# Altium PCB NB2DSK01.PcbDoc (part 17 of 17)
Units mil, origin at the board's own origin, x right, y up, seen from the top; angles counter-clockwise.
Board outline 11815 x 6500.03 mil, 8 copper layers (Top Layer, MidLayer1, MidLayer2, GND, PWR, MidLayer3, MidLayer4, Bottom Layer), stack 74.62 mil thick; 798 components, 1002 nets, 3927 pads, 3182 vias.
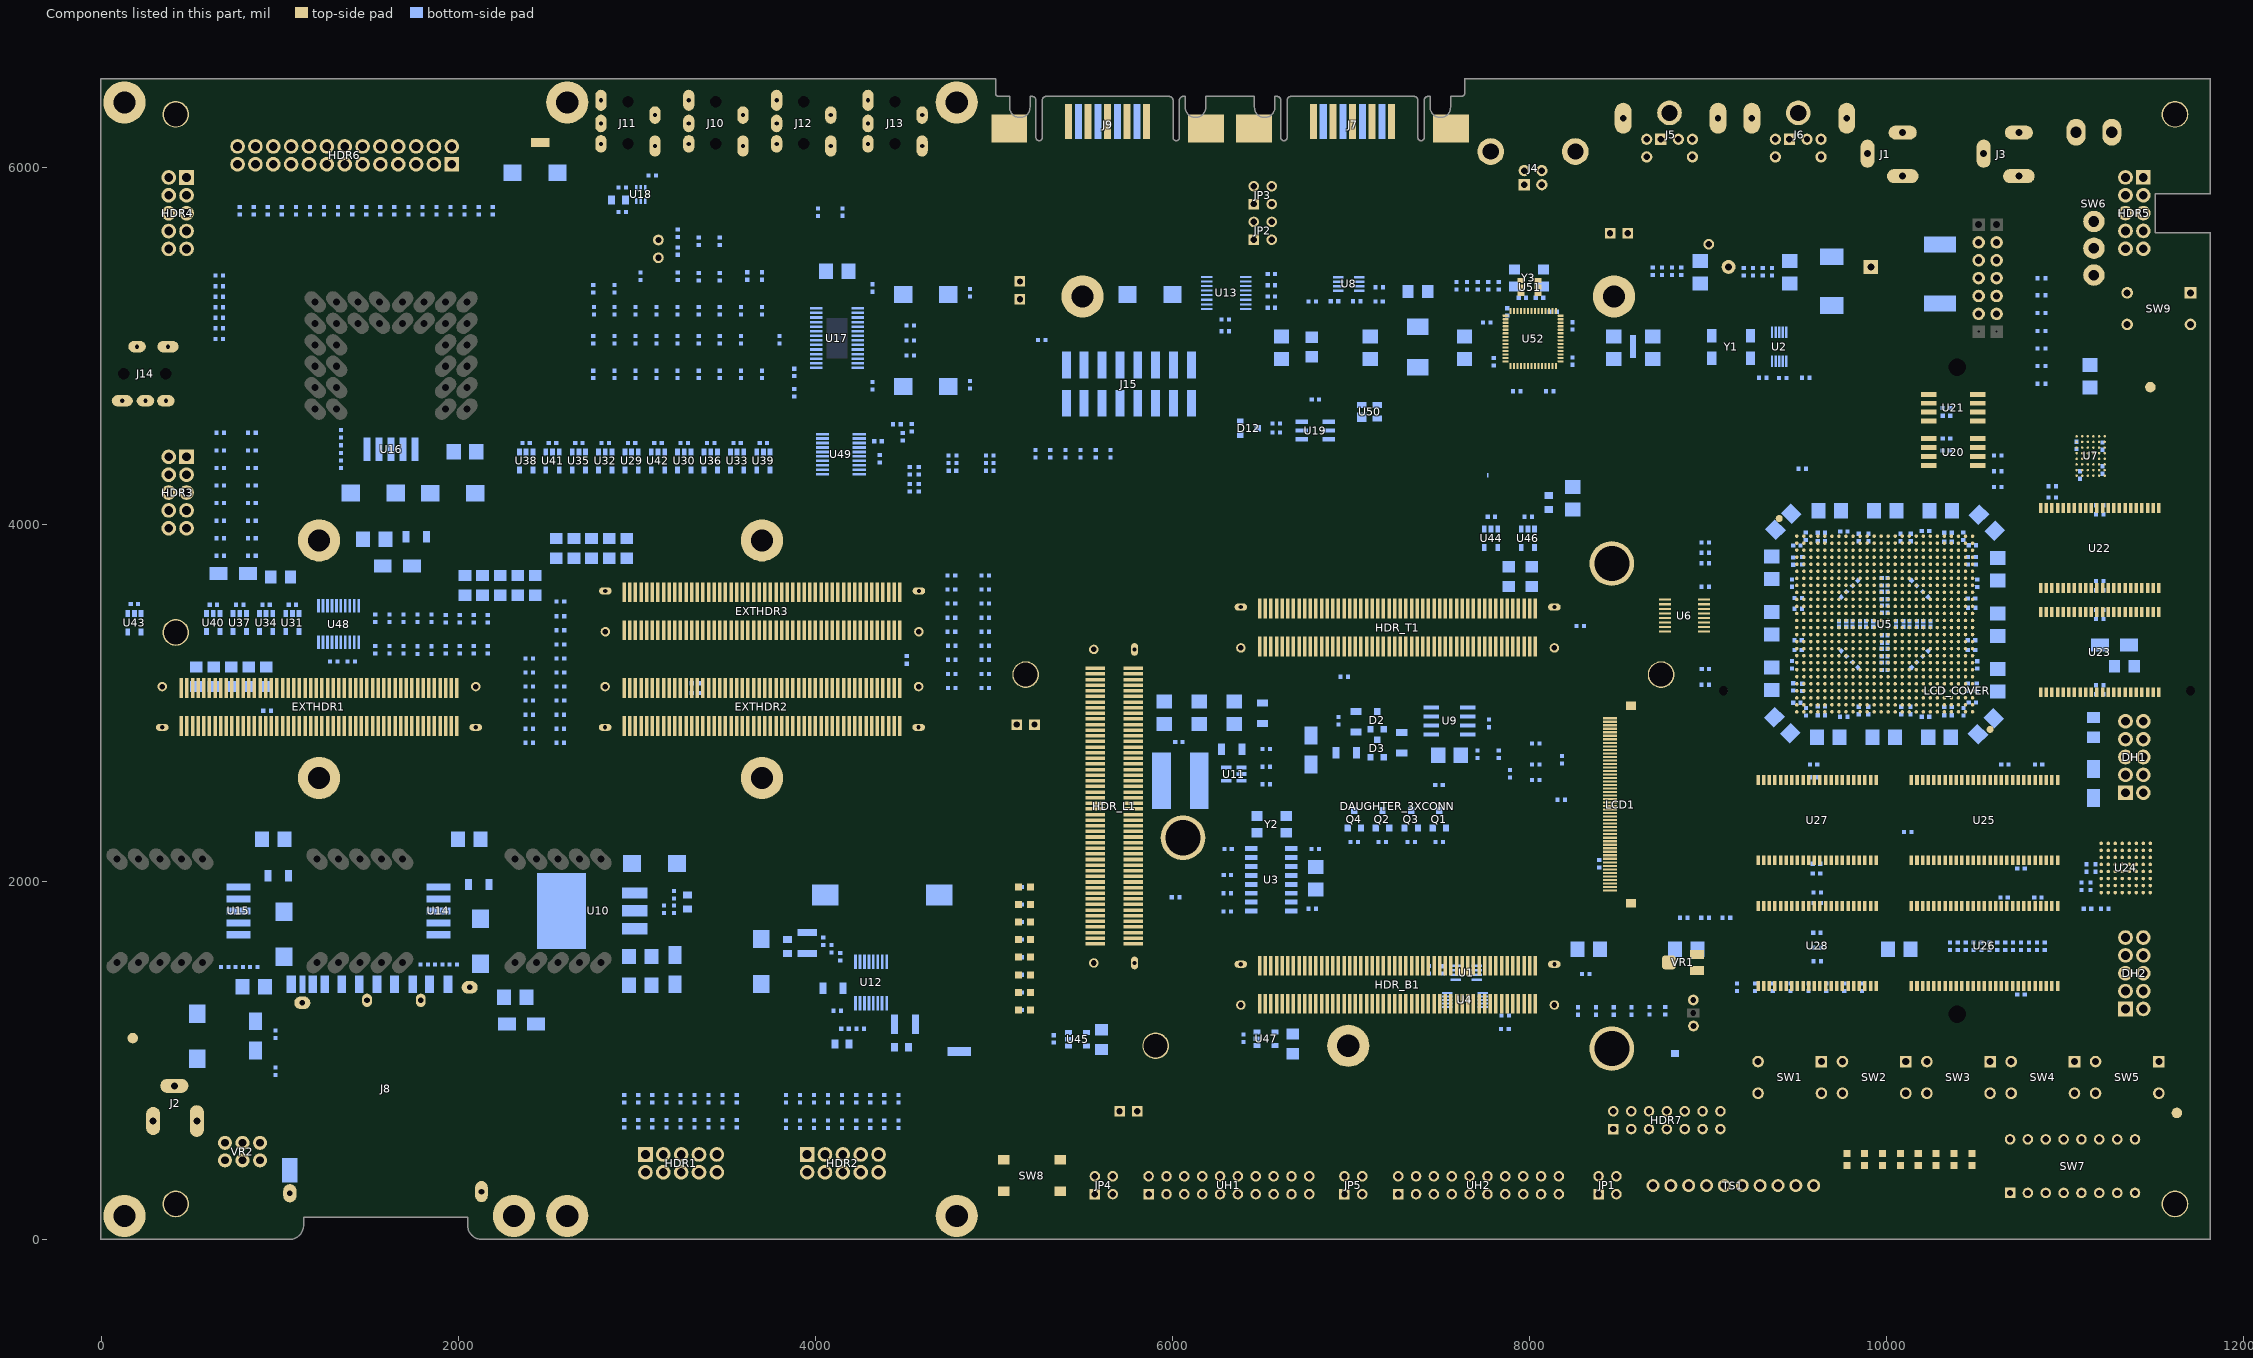
[diagram p23: the components of this part, seen from the top]

## Silkscreen, mask and mechanical layers (free items; w line width, h text height) (continued)
6. Fabrication Notes:
  drawing of 1666 lines, arcs and shapes, not listed
  text "1" at -314.94,10439.41 h118
  text "2" at 2519.06,10439.41 h118
  text "3" at 5354.06,10439.41 h118
  text "4" at 8070.06,10439.41 h118
  text "5" at 10905.06,10439.41 h118
  text "6" at 13661.06,10439.41 h118
  text "7" at 16496.06,10439.41 h118
  text "8" at 19409.06,10439.41 h118
  text "DESIGN INFORMATION" at 15492.06,10277.77 h79
  text "PRODUCT FAMILY" at -1394.28,10247.94 h118.11
  text "DRAWING ID/MODEL." at 1499.42,10247.94 h118.11
  text "(REFER ALSO PROFILING INFORMATION)" at 18009.06,10128.77 h69
  text "BOARD TECHNOLOGY" at 15492.06,10119.77 h75
  text "BOARD SIZE" at 17323.06,10119.77 h75
  text "4 TRACK" at 15486.86,9999.98 h69
  text "24 VIA" at 16051.86,9999.98 h69
  text "4 SPACE" at 16551.86,9999.98 h69
  text "300mm" at 17322.61,9991.95 h69
  text "165mm" at 18066.7,9991.95 h69
  text "X" at 17942.03,9984.27 h69
  text "NANOBOARD" at -780.94,9941.41 h120
  text "NB2DSK01.08" at 2377.81,9937.89 h140
  text "(MIN. TRACK / PADS / CLEARANCE" at 15494.06,9813.77 h69
  text "IN 0.001\" )" at 17265.06,9813.77 h69
  text "EXTERNAL" at 17546.06,9693.77 h69
  text "PER IPC-D-275 CLASS 2" at 18098.06,9693.77 h69
  text "LEVEL C AND IS THE" at 19426.06,9693.77 h69
  text "MINIMUM ANNULAR RING 0.05MM" at 15494.06,9692.77 h69
  text "(0.002\")" at 17088.06,9692.77 h69
  text "LAYER STACK CONFIGURATION" at 6836.2,9682.9 h49.21
  text "MANUFACTURING REGISTRATION" at 15499.06,9575.77 h69
  text "ALLOWANCE" at 17054.06,9575.77 h69
  text "BUILD CONFIGURATION AND SPECIFICATIONS SUMMARY" at 11029.67,9573.32 h80
  text "8 LAYER BUILD" at 7051.1,9411.9 h49.21
  text "8 Layer Build" at 11108.57,9403.82 h60
  text "Silk-Screened White Legend" at 12874.57,9403.82 h60
  text "5 Thou Tracks / 5 Thou Spacing" at 11108.57,9293.82 h60
  text "DO NOT TRIM Legend (Silkscreen)" at 12874.57,9293.82 h60
  text "BUILD STATISTICS" at 128.84,9268.04 h60
  text "BUILD STATISTICS" at 128.84,9268.04 h60
  text "8" at 20232.28,9196.85 h69
  text "CIRCUIT TYPE:" at 15492.06,9195.77 h75
  text "SS" at 16492.18,9195.77 h69
  text "DS" at 17243.06,9195.77 h69
  text "PTH MULTILAYER" at 18050.06,9195.77 h69
  text "Number of Layers :" at 19114.06,9195.77 h69
  text "X" at 17897.64,9192.91 h69
  text "24 Thou Via / 0.30mm Hole" at 11108.57,9183.82 h60
  text "Board Thickness Approx 1.7mm" at 12874.57,9183.83 h60
  text "A" at -1614.94,9179.41 h118
  text "A" at 20590.06,9179.41 h118
  text "GENERAL" at 120.84,9122.04 h40
  text "GENERAL" at 120.84,9122.04 h40
  text "-  COPPER CLAD" at 7793.54,9079.75 h29.53
  text "-  35 Micron H.T.E" at 8221.54,9079.75 h29.53
  text "TL" at 6748.01,9074.75 h49.21
  text "1 Oz Copper Clad" at 11108.57,9073.82 h60
  text "BOARD OUTLINE Layer Denotes Board Cutout" at 12874.57,9073.82 h60
  text "TOP LAYER" at 6246.77,9051.75 h49.21
  text ".Net_Count" at 501.84,9039.04 h40
  text ".Net_Count" at 501.84,9039.04 h40
  text "NETS" at 123.84,9037.04 h35
  text "NETS" at 123.84,9037.04 h35
  text "-  PRE-PREG" at 7818.54,9024.75 h29.53
  text "-  1080" at 8221.54,9023.75 h29.53
  text "FINGER CONNECTOR DIM PER:" at 15492.06,9018.77 h75
  text "AS SHOWN" at 19114.06,9018.77 h69
  text "-  PRE-PREG" at 7818.54,8979.82 h29.53
  text "-  1080" at 8221.54,8978.75 h29.53
  text "3um Immersion Gold" at 11108.57,8963.82 h60
  text "Must be BBT (Bare Board Tested)" at 12874.57,8963.82 h60
  text ".Component_Count" at 501.84,8957.04 h40
  text ".Component_Count" at 501.84,8957.04 h40
  text "COMPONENTS" at 124.84,8956.04 h35
  text "COMPONENTS" at 124.84,8956.04 h35
  text "MID LAYER 1" at 6246.78,8933.31 h49.21
  text "L1" at 6748,8929.81 h49.21
  text "-  35 Micron H.T.E" at 8221.54,8927.75 h29.53
  text "-  COPPER CLAD" at 7792.77,8927.65 h29.53
  text "-  CORE" at 7818.54,8874.82 h29.53
  text "-  0.25mm 35/35" at 8221.54,8874.75 h29.53
  text "No. OFF TOTAL" at 16516.06,8860.77 h69
  text "Gloss Black Solder Mask" at 11108.57,8853.82 h60
  text "Include BBT Certificate with Order" at 12874.57,8853.82 h60
  text "BOTH SIDES" at 19114.06,8842.27 h69
  text "ONE SIDE" at 18051.06,8840.77 h69
  text "-  35 Micron H.T.E" at 8221.54,8820.75 h29.53
  text "-  COPPER CLAD" at 7792.77,8820.15 h29.53
  text "PRIMITIVES" at 121.84,8819.04 h40
  text "PRIMITIVES" at 121.84,8819.04 h40
  text "MID LAYER 2" at 6247.69,8812.84 h49.21
  text "L2" at 6747.69,8812.84 h49.21
  text "-  1080" at 8221.54,8770.75 h29.53
  text "-  PRE-PREG" at 7817.77,8769.2 h29.53
  text ".Fill_Count" at 501.84,8735.04 h40
  text ".Fill_Count" at 501.84,8735.04 h40
  text "FILLS" at 124.84,8734.04 h35
  text "FILLS" at 124.84,8734.04 h35
  text "Include All BBT Failed Boards With Order" at 11109.57,8731.82 h60
  text "-  PRE-PREG" at 7817.77,8724.27 h29.53
  text "-  1080" at 8221.54,8723.75 h29.53
  text "P1" at 6747.69,8672.84 h49.21
  text "-  COPPER CLAD" at 7792.01,8672.1 h29.53
  text "-  35 Micron H.T.E" at 8221.54,8670.75 h29.53
  text "INTERNAL PLANE 1" at 6062.99,8669.29 h49.21
  text ".Track_Count" at 501.84,8654.04 h40
  text ".Track_Count" at 501.84,8654.04 h40
  text "TRACKS" at 124.84,8652.04 h35
  text "TRACKS" at 124.84,8652.04 h35
  text "FEED THRU'" at 16527.24,8645.27 h69
  text "TENTED" at 17480.06,8645.27 h69
  text "VIAS:" at 15492.06,8643.77 h75
  text "BURIED LAYER SEQUENCE" at 18425.06,8643.77 h69
  text "NONE" at 15987.41,8642.75 h69
  text "X" at 17303.06,8643.27 h69
  text "X" at 16337.21,8641.77 h69
  text "-  CORE" at 7817.77,8619.27 h29.53
  text "-  0.25mm 35/35" at 8221.54,8618.75 h29.53
  text ".String_Count" at 501.84,8572.04 h40
  text ".String_Count" at 501.84,8572.04 h40
  text "STRINGS" at 124.84,8570.04 h35
  text "STRINGS" at 124.84,8570.04 h35
  text "-  COPPER CLAD" at 7792.01,8564.6 h29.53
  text "-  35 Micron H.T.E" at 8221.54,8563.75 h29.53
  text "P2" at 6746.94,8557.29 h49.21
  text "INTERNAL PLANE 2" at 6062.99,8555.12 h49.21
  text "-  1080" at 8221.54,8513.75 h29.53
  text "-  PRE-PREG" at 7817.01,8513.65 h29.53
  text ".Arc_Count" at 501.84,8489.04 h40
  text ".Arc_Count" at 501.84,8489.04 h40
  text "ARC'S" at 124.84,8487.04 h35
  text "ARC'S" at 124.84,8487.04 h35
  text "-  PRE-PREG" at 7817.01,8468.73 h29.53
  text "-  1080" at 8221.54,8468.75 h29.53
  text "UNIQUE DRILL" at 16527.24,8448.27 h69
  text "2 SIZES" at 17480.06,8446.77 h69
  text "BLIND LAYER SEQUENCE" at 18425.06,8446.77 h69
  text "X" at 16337.06,8444.27 h69
  text "MID LAYER 3" at 6246.94,8417.27 h49.21
  text "L3" at 6746.94,8417.27 h49.21
  text "-  35 Micron H.T.E" at 8221.54,8416.75 h29.53
  text "-  COPPER CLAD" at 7791.25,8416.55 h29.53
  text "LANDS" at 120.84,8368.04 h40
  text "LANDS" at 120.84,8368.04 h40
  text "-  CORE" at 7817.01,8363.73 h29.53
  text "-  0.25mm 35/35" at 8221.54,8363.75 h29.53
  text "-  COPPER CLAD" at 7791.25,8309.05 h29.53
  text "-  35 Micron H.T.E" at 8221.54,8308.75 h29.53
  text "MID LAYER 4" at 6246.19,8301.74 h49.21
  text "L4" at 6746.19,8301.74 h49.21
  text ".Pad_Count" at 501.84,8284.04 h40
  text ".Pad_Count" at 501.84,8284.04 h40
  text "PADS" at 124.84,8282.04 h35
  text "PADS" at 124.84,8282.04 h35
  text "X" at 18964.06,8271.27 h69
  text "AS SHOWN" at 19114.06,8271.27 h69
  text "LAYER CONSTRUCTION PER:" at 15492.06,8269.77 h75
  text "LAMINATION SEQUENCE" at 17303.06,8269.77 h69
  text "-  PRE-PREG" at 7816.25,8258.11 h29.53
  text "-  1080" at 8221.54,8257.75 h29.53
  text "-  PRE-PREG" at 7816.25,8213.18 h29.53
  text "-  1080" at 8221.54,8210.75 h29.53
  text ".Via_Count" at 501.84,8202.04 h40
  text ".Via_Count" at 501.84,8202.04 h40
  text "VIA'S" at 125.84,8201.04 h35
  text "VIA'S" at 125.84,8201.04 h35
  text "BL" at 6746.18,8161.73 h49.21
  text "-  35 Micron H.T.E" at 8221.54,8161.75 h29.53
  text "BOTTOM LAYER" at 6169.29,8161.42 h49.21
  text "-  COPPER CLAD" at 7790.49,8161 h29.53
  text "NB2DSK01" at 18987.53,8102.19 h70
  text "FILE NAME:" at 18440.4,8090.49 h69
  text "X" at 17894.06,8076.27 h69
  text "CAD" at 18051.06,8075.27 h69
  text "ARTWORK:" at 15492.06,8073.77 h75
  text "MANUAL" at 16491.87,8073.77 h69
  text "DIGITISED" at 17244.06,8073.77 h69
  text "PRINT SCALE" at 117.84,8051.04 h40
  text "PRINT SCALE" at 117.84,8051.04 h40
  text "GERBER SET" at 18987.53,7988.01 h69
  text "FILE TYPE:" at 18440.4,7985.49 h69
  text ".Print_Scale" at 499.84,7966.04 h40
  text ".Print_Scale" at 499.84,7966.04 h40
  text "SCALE" at 122.84,7965.04 h35
  text "SCALE" at 122.84,7965.04 h35
  text "SUPPLIED ARTWORK/PATTERN MASTER LIST" at 15492.06,7825.77 h79
  text "TOTAL BOARD THICKNESS: APPROX" at 6151.61,7823.95 h49.21
  text "1.7mm +/- 0.1mm" at 7464,7797 h160
  text "DRAWING No./CAD FILE REF." at 17345.06,7675.77 h69
  text "REVISION" at 19951.25,7670.27 h69
  text "DESCRIPTION" at 15709.06,7668.77 h69
  text "8" at 20122.44,7490.47 h69.02
  text "NB2DSK01" at 15574.02,7472.28 h69.02
  text "ALTIUM NANOBOARD DESKTOP VERSION 8" at 17194.02,7472.28 h69.02
  text "B" at -1594.94,6424.41 h118
  text "B" at 20610.06,6424.41 h118
  text "DRILL DRAWING" at 15726.49,4082.96 h69
  text "APERTURE TABLES\FILES ARE EMBEDDED" at 17335.49,4082.96 h69
  text "1" at 20121.36,4080.74 h69
  text "C" at -1594.94,3864.41 h118
  text "C" at 20610.06,3864.41 h118
  text "POLYIMIDE" at 18482.32,3801.3 h69
  text "FR4-01" at 16428.87,3798.41 h69
  text "FR4-04" at 17137.87,3798.41 h69
  text "FR4-08" at 17826.87,3798.41 h69
  text "ARLON" at 19223.87,3798.41 h69
  text "TUC-722" at 19931.87,3798.41 h69
  text "X" at 19739.86,3792.34 h69
  text "MATERIAL:" at 15493.45,3791.31 h75
  text "THICKNESS:" at 15984.06,3611.41 h69
  text "~0.8mm" at 16850.06,3611.41 h69
  text "1.2mm" at 17559.06,3611.41 h69
  text "2mm" at 18937.06,3611.41 h69
  text "3.2mm" at 19645.06,3611.41 h69
  text "1.7mm" at 18240.17,3607.47 h69
  text "X" at 18058,3606 h69
  text "X" at 16660.64,3436.25 h68.9
  text "IN A/W ANSI IPC-6012 TYPE 3 CLASS 2" at 16850.08,3434.92 h69.02
  text "TOLERANCE:" at 15945.06,3433.41 h69
  text "OTHER +/-" at 19173.06,3433.41 h69
  text "X" at 16659.06,3258.91 h69
  text "IN A/W ANSI IPC-6012 TYPE 3 CLASS 2" at 16850.08,3257.91 h69.02
  text "BOW & TWIST:" at 15827.06,3256.41 h69
  text "AS SHOWN" at 19173.06,3256.41 h69
  text "COPPER THICKNESS (FINISHED)" at 15669.06,3078.41 h69
  text "18um (1/2oz)" at 16850.06,2902.91 h69
  text "OUTER:" at 16181.06,2901.41 h69
  text "35um (1oz)" at 18051.06,2901.41 h69
  text "70um (2oz)" at 19173.06,2901.41 h69
  text "X" at 17861.03,2898.41 h69
  text "18um (1/2oz)" at 16850.06,2725.91 h69
  text "INNER SIGNAL:" at 15846.06,2724.41 h69
  text "35um (1oz)" at 18051.06,2724.41 h69
  text "70um (2oz)" at 19173.06,2724.41 h69
  text "X" at 17861.03,2721.41 h69
  text "18um (1/2oz)" at 16850.06,2549.91 h69
  text "INNER PWR:" at 15964.06,2548.41 h69
  text "35um (1oz)" at 18051.06,2548.41 h69
  text "70um (2oz)" at 19173.06,2548.41 h69
  text "X" at 17861.03,2545.41 h69
  text "STRUCTURE:" at 15512.06,2351.41 h75
  text "REFER" at 16850.23,2351.41 h69
  text "AS SHOWN" at 19173.06,2175.91 h69
  text "X" at 18979.06,2174.91 h69
  text "AS PER DRAWING No." at 16850.06,2174.41 h69
  text "DRILLING:" at 15512.06,2016.41 h75
  text "X" at 16664.06,1880.91 h69
  text "COMPONENT SIDE" at 16850.06,1880.91 h69
  text "VIEWED FROM:" at 15846.06,1879.41 h69
  text "SOLDER SIDE" at 18051.06,1879.41 h69
  text "X" at 16664.06,1704.91 h69
  text "X" at 19489.06,1704.91 h69
  text "AS SHOWN" at 16850.06,1702.91 h69
  text "NC_ DRILL FILES" at 19685.06,1702.91 h69
  text "REFERENCE:" at 15945.06,1701.41 h69
  text "PATTERN MASTER LIST" at 18051.06,1701.41 h69
  text "20um" at 18051.06,1524.91 h69
  text "X" at 17859.06,1523.91 h69
  text "PTH MINIMUM COPPER THICKNESS:" at 16082.06,1523.41 h69
  text "OTHER" at 19173.06,1523.41 h69
  text "NPTH:" at 16220.06,1345.41 h69
  text "TENTED" at 16850.06,1345.41 h69
  text "PADS REMOVED" at 18051.06,1345.41 h69
  text "REMOVE PADS" at 19173.06,1345.41 h69
  text "NONE" at 19680.94,1168.91 h69
  text "2nd DRILL" at 16850.06,1167.41 h69
  text "BOTH" at 18051.06,1167.41 h69
  text "X" at 18451.53,1166.77 h69
  text "AS SHOWN" at 18641.57,1167.41 h69
  text "D" at -1594.94,1148.41 h118
  text "D" at 20610.06,1148.41 h118
  text "ETCHING" at 16850.06,951.91 h69
  text "BOARD FINISH:" at 15512.06,950.41 h75
  text "REFER PATTERN MASTER LIST" at 18051.06,950.41 h69
  text "X" at 18455.06,775.91 h69
  text "X" at 19499.06,775.91 h69
  text "COMPONENT" at 18641.06,773.91 h69
  text "SOLDER" at 19685.06,773.91 h69
  text "LEGEND / SCREEN PRINT:" at 16082.06,772.41 h69
  text "NONE" at 17756.06,772.41 h69
  text "mm" at -1849.94,754.41 h79 r90
  text "WHITE" at 16850.06,596.91 h69
  text "COLOUR:" at 16082.06,595.41 h69
  text "YELLOW" at 18051.06,595.41 h69
  text "OTHER" at 19173.06,595.41 h69
  text "X" at 16656.82,594.07 h69
  text "SCREEN PRINT" at 18641.06,400.91 h69
  text "SOLDER RESIST:" at 15768.06,399.41 h69
  text "LIQUID PHOTOIMAGEABLE" at 16850.06,399.41 h69
  text "X" at 18451.03,396.41 h69
  text "MATTE" at 17439.03,222.77 h69
  text "BLACK" at 19659.03,222.77 h69
  text "COLOUR:" at 16082.06,221.41 h69
  text "GLOSS" at 16850.06,221.41 h69
  text "BLUE" at 18641.06,221.41 h69
  text "G/Y" at 19173.06,221.41 h69
  text "X" at 16660.03,218.41 h69
  text "GREEN" at 18046.32,218.21 h69
  text "X" at 19495.03,218.41 h69
  text "TRACK FINISH:" at 15512.06,25.41 h75
  text "SELECTIVE SOLDER" at 16850.06,25.41 h69
  text "REFLOW SOLDER" at 18405.06,25.41 h69
  text "Radius 2.0mm" at 1392,-87 h39.37
  text "HASL (HOT AIR SOLDER LEVEL)" at 16850.36,-161.33 h69
  text "REFER PATTERN MASTER LIST" at 16850.06,-327.59 h69
  text "OTHER" at 18633.82,-327.59 h69
  text "3um IMMERSION GOLD SMOBC (SOLDER MASK OVER BARE COPPER)" at 16850.06,-524.09 h69
  text "X" at 16661.12,-529.41 h69
  text "HARD GOLD PLATE FINISH" at 16850.06,-702.59 h69
  text "OTHER" at 18405.06,-702.59 h69
  text "AS SHOWN" at 16850.06,-879.59 h69
  text "REFER" at 18405.06,-879.59 h69
  text "X" at 16659.06,-1074.09 h69
  text "CUT AND TRIM ACCORDING TO LAYER MECHANICAL 1 (BOARD OUTLINE)" at 16850.06,-1076.09 h69
  text "PROFILING:" at 15512.06,-1077.59 h75
  text "REFER PCB BLANK DWG No." at 16850.06,-1253.59 h69
  text "USE PROFILE/ ROUTE TAPE SUPPLIED" at 16850.06,-1430.59 h69
  text "(REFER PATTERN MASTER LIST)" at 18680.32,-1431.39 h69
  text "E" at -1594.94,-1509.59 h118
  text "E" at 20610.06,-1509.59 h118
  text "SQUARE CUT" at 16850.06,-1607.09 h69
  text "X" at 17625.03,-1609.23 h69
  text "N.C. ROUTE" at 17815.06,-1608.59 h69
  text "V. SCORE" at 18681.06,-1608.59 h69
  text "BLANK" at 19488.06,-1608.59 h69
  text "ACCEPTABILITY:" at 15492.06,-1805.59 h75
  text "MATERIALS AND WORKMANSHIP FOR" at 16653.06,-1805.59 h69
  text "ALL PRINTED WIRING BOARDS TO MEE" at 18425.06,-1805.59 h69
  text "T" at 20216.06,-1806.59 h69
  text "OR EXCEED THE REQUIREMENTS OF:" at 16634.06,-1923.59 h69
  text "X" at 16660.57,-2074.09 h69
  text "IN A/W ANSI IPC-A-600F" at 16849.57,-2080.09 h69
  text "2" at 18937.57,-2080.09 h69
  text "1" at 18622.57,-2081.59 h69
  text "3" at 19291.57,-2081.59 h69
  text "X" at 18786.62,-2085.41 h69
  text "UL CERTIFICATION" at 16849.57,-2259.59 h69
  text "AUSTEL" at 18661.57,-2259.59 h69
  text "A" at 17992.64,-2435.92 h69
  text "B" at 18307.64,-2435.92 h69
  text "MIL-P-55110E GRP" at 16849.57,-2436.59 h69
  text "AS2546" at 18655.97,-2436.59 h69
  text "OTHER" at 19448.97,-2436.59 h69
  text "ADDITIONAL REQUIREMENTS:" at 15489.06,-2596.59 h75
  text "NONE" at 16849.57,-2730.09 h69
  text "MICROSECTION:" at 15748.06,-2731.59 h69
  text "SAMPLE PLAN" at 17381.83,-2731.59 h69
  text "MIL-P-55110E SERIAL Nos. PER ORDER" at 18405.51,-2731.59 h69
  text "X" at 16658.35,-2736.04 h69
  text "2" at 20117.06,-2908.09 h69
  text "MIL-P-55110E GRP" at 17381.06,-2909.03 h69
  text "A" at 18524.14,-2908.36 h69
  text "B" at 18839.14,-2908.36 h69
  text "CERTIFICATION:" at 15748.06,-2909.59 h69
  text "NONE" at 16849.57,-2909.59 h69
  text "IPC CLASS:" at 18995.06,-2909.59 h69
  text "1" at 19764.06,-2909.59 h69
  text "3" at 20433.06,-2909.59 h69
  text "X" at 19927.03,-2912.59 h69
  text "PER ORDER" at 19645.03,-3079.73 h69
  text "QUALITY RELEASE REPORT" at 17381.06,-3087.59 h69
  text "OTHER" at 19192.06,-3087.59 h69
  text "X" at 19004.81,-3095.8 h69
  text "X" at 18200.06,-3260.09 h69
  text "REQUIRED" at 18400.06,-3263.09 h69
  text "ELECTRICAL TEST: Bare Board" at 15748.06,-3264.59 h66.93
  text "NONE" at 17381.06,-3264.59 h69
  text "PER ORDER" at 19192.06,-3264.59 h69
  text "0" at -1849.94,-3300.59 h79 r90
  text "2 SIDES" at 18522.77,-3441.09 h69
  text "MIN. PITCH" at 19193.06,-3441.42 h69
  text "SURFACE MOUNT:" at 15748.06,-3442.59 h69
  text "NONE" at 17381.06,-3442.59 h69
  text "0.65MM" at 19888.73,-3443.52 h69
  text "1 SIDE" at 17945.03,-3444.73 h69
  text "X" at 18329.03,-3450.23 h69
  text "LEGEND" at 18523.06,-3617.09 h69
  text "MANUFACTURER'S ID/LOGO:" at 15748.06,-3618.59 h69
  text "NONE" at 17381.06,-3618.59 h69
  text "FOIL" at 17971.38,-3618.59 h69
  text "REFER" at 19193.06,-3618.59 h69
  text "X" at 18333.03,-3621.59 h69
  text "X" at 17489.06,-3795.09 h69
  text "IS09001/AS3901" at 17676.06,-3795.09 h69
  text "NONE" at 18997.06,-3796.59 h69
  text "MANUFACTURER'S ACCREDITATION:" at 15748.06,-3816.59 h69
  text "DO NOT" at -2223.94,-3851.59 h79
  text "SCALE" at -2204.94,-3989.59 h79
  text "X" at 17187.68,-3990.09 h69
  text "PER ORDER" at 17384.68,-3991.09 h69
  text "PACKAGING AND HANDLING:" at 15748.06,-3992.59 h69
  text "REFER" at 18400.06,-3992.59 h69
  text "DIMENSIONS" at -2342.94,-4186.59 h79
  text "F" at -1594.94,-4225.59 h118
  text "F" at 20610.06,-4225.59 h118
  text "SCALE:" at 18935.76,-4284.52 h70
  text "NANOBOARD - NB2DSK" at 12679.31,-4287.87 h60
  text "PRODUCT" at 11970.02,-4302.88 h70
  text "ALTIUM LIMITED." at 16104.2,-4305.4 h80
  text "DATE" at 14446.92,-4307.51 h70
  text "IN" at -2086.94,-4324.59 h79
  text "LEVEL 3 / 12A RODBOROUGH ROAD" at 16102.2,-4428.8 h70
  text ".Print_Scale" at 19332.03,-4458.73 h100
  text "MILLIMETRES" at -2361.94,-4481.59 h79
  text "HARDWARE DEVELOPMENT GROUP" at 12679.32,-4486.9 h60
  text "DRAWN" at 11970.02,-4500.51 h70
  text "11.NOV.07" at 14345.02,-4504.72 h70
  text "FRENCHS FOREST - SYDNEY 2086" at 16102.2,-4570.2 h70
  text "DATE:" at 18932.76,-4678.22 h70
  text "APPROVED" at 11970.02,-4694.51 h70
  text "S.HOWELL" at 12679.32,-4698.72 h60
  text "NSW AUSTRALIA" at 16102.2,-4701.6 h70
  text "11.NOV.07" at 14345.02,-4704.72 h70
  text ".Print_Date" at 19302.03,-4833.73 h100
  text "RELEASE VERSION" at 5536.93,-4888.74 h70
  text "8" at 5045.93,-4892.76 h70
  text "PRODUCTION AND LOGISTICS" at 12679.31,-4892.6 h60
  text "CUSTOMER" at 11970.02,-4901.73 h70
  text "Title:" at 15117.92,-4905.81 h80
  text "SHEET" at 18936.23,-5071.92 h70
  text "NB2DSK01.08 DESKTOP NANOBOARD" at 15132.03,-5078.74 h90
  text "REVISION" at 4896.91,-5089.75 h70
  text "DESCRIPTION OF TASK OR MODIFICATION" at 7718.91,-5089.75 h70
  text "DATE" at 11455.8,-5108.92 h70
  text "APPD" at 10865.25,-5111.17 h70
  text "A2" at 20287.92,-5197.51 h78.74
  text ".Pcb_File_Name" at 7189.02,-5277.69 h70
  text ".Printout_Name" at 5584.02,-5292.73 h70
  text "TEMPLATE: -" at 4896.91,-5294.75 h70
  text "1" at -314.94,-5505.59 h118
  text "2" at 2519.06,-5505.59 h118
  text "3" at 5354.06,-5505.59 h118
  text "4" at 8070.06,-5505.59 h118
  text "5" at 10905.06,-5505.59 h118
  text "6" at 13661.06,-5505.59 h118
  text "7" at 16496.06,-5505.59 h118
  text "8" at 19409.06,-5505.59 h118
7. Assembly - Top:
  circle w5: c11614.18,6299.3 r110.24
  lines w5: 0,3228.35 0,3267.72 0,6496.07
8. Assembly - Bottom:
  circle w7.87: c4385.83,1901.58 r216.54
  circle w7.87: c4385.83,1901.58 r285.43
  lines w1.97: 8354.33,4346.46 9512.87,4346.46 9535.43,4311.02 ; 9415.02,4235.46 cw(c9988.19,3444.88) 9665.07,4366.37 ; 9527.56,4318.9 9535.43,4311.02 ; 9531.5,4322.84 9535.43,4311.02
  lines w7.87: 4192.32,1675.82 4015.75,1803.15 4015.75,2000 4192.32,2127.33 ; 4346.46,1901.58 4425.2,1901.58 ; 4385.83,1862.21 4385.83,1940.95 ; 4575.4,1675.82 4751.97,1803.15 4751.97,2000 4575.4,2127.33
  text "RED" at 3000.63,5964.57 h62.99
  text "BLUE" at 4519.69,5964.57 h62.99
  text "BLACK" at 3528.19,5960.63 h62.99
  text "GREEN" at 4036.06,5960.63 h62.99
  text "BLACK" at 527.56,4937.01 h62.99 r90
  text "See Detail Drawing - FPGA Discretes" at 9507.87,4358.27 h78.74
15. Dimension-Mount:
  lines w3.94: 0,78.74 0,3228.35 ; 0,3267.72 0,6496.06
Drill Drawing:
  text ".Legend" at -1320.91,-5240.51 h68.9

## Dimensions
6984.25,1082.68 to 5673.23,1487.8 on 5. Daughter
6984.25,1082.68 to 6224.41,1523.23 on 5. Daughter
6984.25,1082.68 to 6322.83,3425.2 on 5. Daughter
6984.25,1082.68 to 5575.2,1389.77 on 5. Daughter
6984.25,1082.68 to 6322.83,1425.2 on 5. Daughter
6984.25,1082.68 to 8472.44,5279.53 on 5. Daughter
6984.25,1082.68 to 5496.06,5279.53 on 5. Daughter
6984.25,1082.68 to 8472.44,5279.53 on 5. Daughter
2255.91,2882.28 to 185.04,2882.29 on 5. Daughter
11811.02,6496.06 to 11614.17,6299.21 on 15. Dimension-Mount
417.32,3397.64 to 1134.12,121.47 on 15. Dimension-Mount
0,6496.06 to 417.32,6299.21 on 15. Dimension-Mount
417.32,6299.21 to 0,6496.06 on 15. Dimension-Mount
0,6496.06 to 5905.51,5279.53 on 15. Dimension-Mount
0,6496.06 to 11614.17,6299.21 on 15. Dimension-Mount
417.32,196.85 to 0,0 on 15. Dimension-Mount
8736.22,3161.42 to 0,6496.06 on 15. Dimension-Mount
0,0 to 5905.51,1082.68 on 15. Dimension-Mount
0,0 to 417.32,3397.64 on 15. Dimension-Mount
5905.51,1082.68 to 0,0 on 15. Dimension-Mount
5177.17,3161.42 to 0,0 on 15. Dimension-Mount
11614.17,196.85 to 11811.02,0 on 15. Dimension-Mount
0,0 to 417.32,196.85 on 15. Dimension-Mount
11811.02,0 to 0,0 on 15. Dimension-Mount
11811.02,0 to 5905.51,5279.53 on 15. Dimension-Mount
5177.17,3161.42 to 11811.02,0 on 15. Dimension-Mount
11811.02,0 to 11614.17,196.85 on 15. Dimension-Mount

## Text inside footprints (layer, text, board x,y; h text height)
DH1: Bottom Overlay "9" at 11279.53,2924.41 h59.06 r90; Bottom Overlay "10" at 11556.6,2944.8 h59.06 r90; Bottom Overlay "1" at 11284.9,2511.4 h59.06 r90; Bottom Overlay "2" at 11552,2515 h59.06 r90
DH2: Bottom Overlay "2" at 11557,1303 h59.06 r90; Bottom Overlay "1" at 11282,1301 h59.06 r90; Bottom Overlay "10" at 11552,1728 h59.06 r90; Bottom Overlay "9" at 11279.53,1713.39 h59.06 r90
HDR1: Bottom Overlay "9" at 3539.37,440.94 h59.06; Bottom Overlay "10" at 3487,262 h59.06; Bottom Overlay "1" at 2992.13,444.88 h59.06; Bottom Overlay "2" at 3062,261 h59.06
HDR2: Bottom Overlay "9" at 4445,448 h59.06; Bottom Overlay "10" at 4392,263 h59.06; Bottom Overlay "1" at 3893.7,444.88 h59.06; Bottom Overlay "2" at 3968,261 h59.06
HDR3: Bottom Overlay "2" at 262.9,4366.1 h59.06 r270; Bottom Overlay "1" at 538.9,4368.5 h59.06 r270; Bottom Overlay "10" at 266,3943.6 h59.06 r270; Bottom Overlay "9" at 535.43,3956.69 h59.06 r270
HDR4: Bottom Overlay "2" at 400.3,6014.1 h34 r270; Bottom Overlay "1" at 539.2,5940 h34 r270; Bottom Overlay "10" at 404,5450 h34 r270; Bottom Overlay "9" at 528.3,5533.1 h34 r270
HDR5: Bottom Overlay "1" at 11416,6055 h34 r90; Bottom Overlay "2" at 11280,5952 h34 r90; Bottom Overlay "10" at 11285,5562 h34 r90; Bottom Overlay "9" at 11416,5495 h34 r90
HDR6: Bottom Overlay "26" at 714,6061 h39.37; Bottom Overlay "1" at 2043.9,5991.73 h40
HDR7: Top Overlay "13" at 9137,606 h39.37; Top Overlay "14" at 9138,702 h39.37; Top Overlay "1" at 8380,596 h39.37; Top Overlay "2" at 8373.5,696.54 h39.37
J5: 7. Assembly - Top "PCB Edge" at 8518.46,6447.13 h31.5
J6: 7. Assembly - Top "PCB Edge" at 9238.94,6447.13 h31.5
J7: Top Overlay "5" at 6730.3,6166.7 h60; Top Overlay "1" at 7258.4,6167.4 h60
J9: Top Overlay "5" at 5362,6167.4 h60; Top Overlay "1" at 5887.2,6167.1 h60; Bottom Overlay "9" at 5423.33,6166.47 h34.02; Bottom Overlay "6" at 5876.11,6164.55 h34.02
J15: Bottom Overlay "16" at 5341.46,4910.97 h50; Bottom Overlay "2" at 6199.39,4909.56 h50; Bottom Overlay "1" at 6197.98,4618.63 h50; Bottom Overlay "15" at 5337.92,4618.63 h50
JP2: Top Overlay "1" at 6358.68,5578.45 h39.37; Top Overlay "2" at 6353.68,5873.45 h39.37; Top Overlay "4" at 6618.68,5873.45 h39.37; Top Overlay "3" at 6618.68,5578.45 h39.37
JP3: Top Overlay "3" at 6618.68,5778.45 h39.37; Top Overlay "4" at 6545.12,5956.85 h39.37; Top Overlay "2" at 6440.12,5956.85 h39.37; Top Overlay "1" at 6358.68,5778.45 h39.37
PBFREE: Top Overlay "Pb" at 4529.17,4925 h120
SW7: Top Overlay "3" at 11070.55,24.24 h94.49; Top Overlay "0" at 11369.62,23.89 h94.49; Top Overlay "1" at 11272.65,22.83 h94.49; Top Overlay "2" at 11168.59,23.18 h94.49; Top Overlay "4" at 10965.79,23.18 h94.49; Top Overlay "5" at 10870.58,23.89 h94.49; Top Overlay "6" at 10769.71,24.24 h94.49; Top Overlay "7" at 10672.73,23.18 h94.49; 7. Assembly - Top "7" at 11280.32,298.58 h31.5; 7. Assembly - Top "6" at 11180.32,298.58 h31.5; 7. Assembly - Top "5" at 11077.17,298.58 h31.5; 7. Assembly - Top "3" at 10880.32,298.58 h31.5; 7. Assembly - Top "2" at 10780.32,298.58 h31.5; 7. Assembly - Top "1" at 10680.32,298.58 h31.5; 7. Assembly - Top "4" at 10978.74,298.58 h31.5; 7. Assembly - Top "8" at 11380.32,298.58 h31.5
U10: Bottom Overlay "3" at 2905.51,1700.79 h31.5 r90; Bottom Overlay "1" at 2909.45,1988.19 h31.5 r90
U14: Bottom Overlay "1" at 1928.05,2035.3 h60 r90
U15: Bottom Overlay "1" at 808.05,2035.3 h60 r90
U16: Bottom Overlay "1" at 1829,4384 h60
UH1: Top Overlay "18" at 6686.14,421.97 h39.37 r90; Top Overlay "17" at 6686.14,121.97 h39.37 r90; Top Overlay "14" at 6486.14,421.97 h39.37 r90; Top Overlay "13" at 6486.14,121.97 h39.37 r90; Top Overlay "10" at 6286.14,421.97 h39.37 r90; Top Overlay "9" at 6286,153 h39.37 r90; Top Overlay "8" at 6186.14,421.97 h39.37 r90; Top Overlay "7" at 6187,152 h39.37 r90; Top Overlay "4" at 5986.14,421.97 h39.37 r90; Top Overlay "3" at 5988,153 h39.37 r90; Top Overlay "5" at 6086,152 h39.37 r90; Top Overlay "11" at 6386.14,136.97 h39.37 r90; Top Overlay "15" at 6586.14,121.97 h39.37 r90; Top Overlay "6" at 6086.14,421.97 h39.37 r90; Top Overlay "12" at 6386.14,421.97 h39.37 r90; Top Overlay "16" at 6586.14,421.97 h39.37 r90; Top Overlay "20" at 6786.14,421.97 h39.37 r90; Top Overlay "19" at 6786.14,121.97 h39.37 r90; Top Overlay "1" at 5886,161 h39.37 r90; Top Overlay "2" at 5886.14,421.97 h39.37 r90
UH2: Top Overlay "18" at 8083.78,421.97 h39.37 r90; Top Overlay "17" at 8083.78,121.97 h39.37 r90; Top Overlay "14" at 7883.78,421.97 h39.37 r90; Top Overlay "13" at 7883.78,121.97 h39.37 r90; Top Overlay "10" at 7683.78,421.97 h39.37 r90; Top Overlay "9" at 7684,152 h39.37 r90; Top Overlay "8" at 7583.78,421.97 h39.37 r90; Top Overlay "7" at 7584,151 h39.37 r90; Top Overlay "4" at 7383.78,421.97 h39.37 r90; Top Overlay "3" at 7384,151 h39.37 r90; Top Overlay "5" at 7484,150 h39.37 r90; Top Overlay "11" at 7783.78,136.97 h39.37 r90; Top Overlay "15" at 7983.78,121.97 h39.37 r90; Top Overlay "6" at 7483.78,421.97 h39.37 r90; Top Overlay "12" at 7783.78,421.97 h39.37 r90; Top Overlay "16" at 7983.78,421.97 h39.37 r90; Top Overlay "20" at 8183.78,421.97 h39.37 r90; Top Overlay "19" at 8183.78,121.97 h39.37 r90; Top Overlay "1" at 7284,157 h39.37 r90; Top Overlay "2" at 7283.78,421.97 h39.37 r90